# Altium PCB PCBKraken.PcbDoc
Units mm, origin at the board's own origin, x right, y up, seen from the top; angles counter-clockwise.
Board outline 105 x 75 mm, 2 copper layers (Top Layer, Bottom Layer); 11 components, 19 nets, 61 pads, 0 vias.
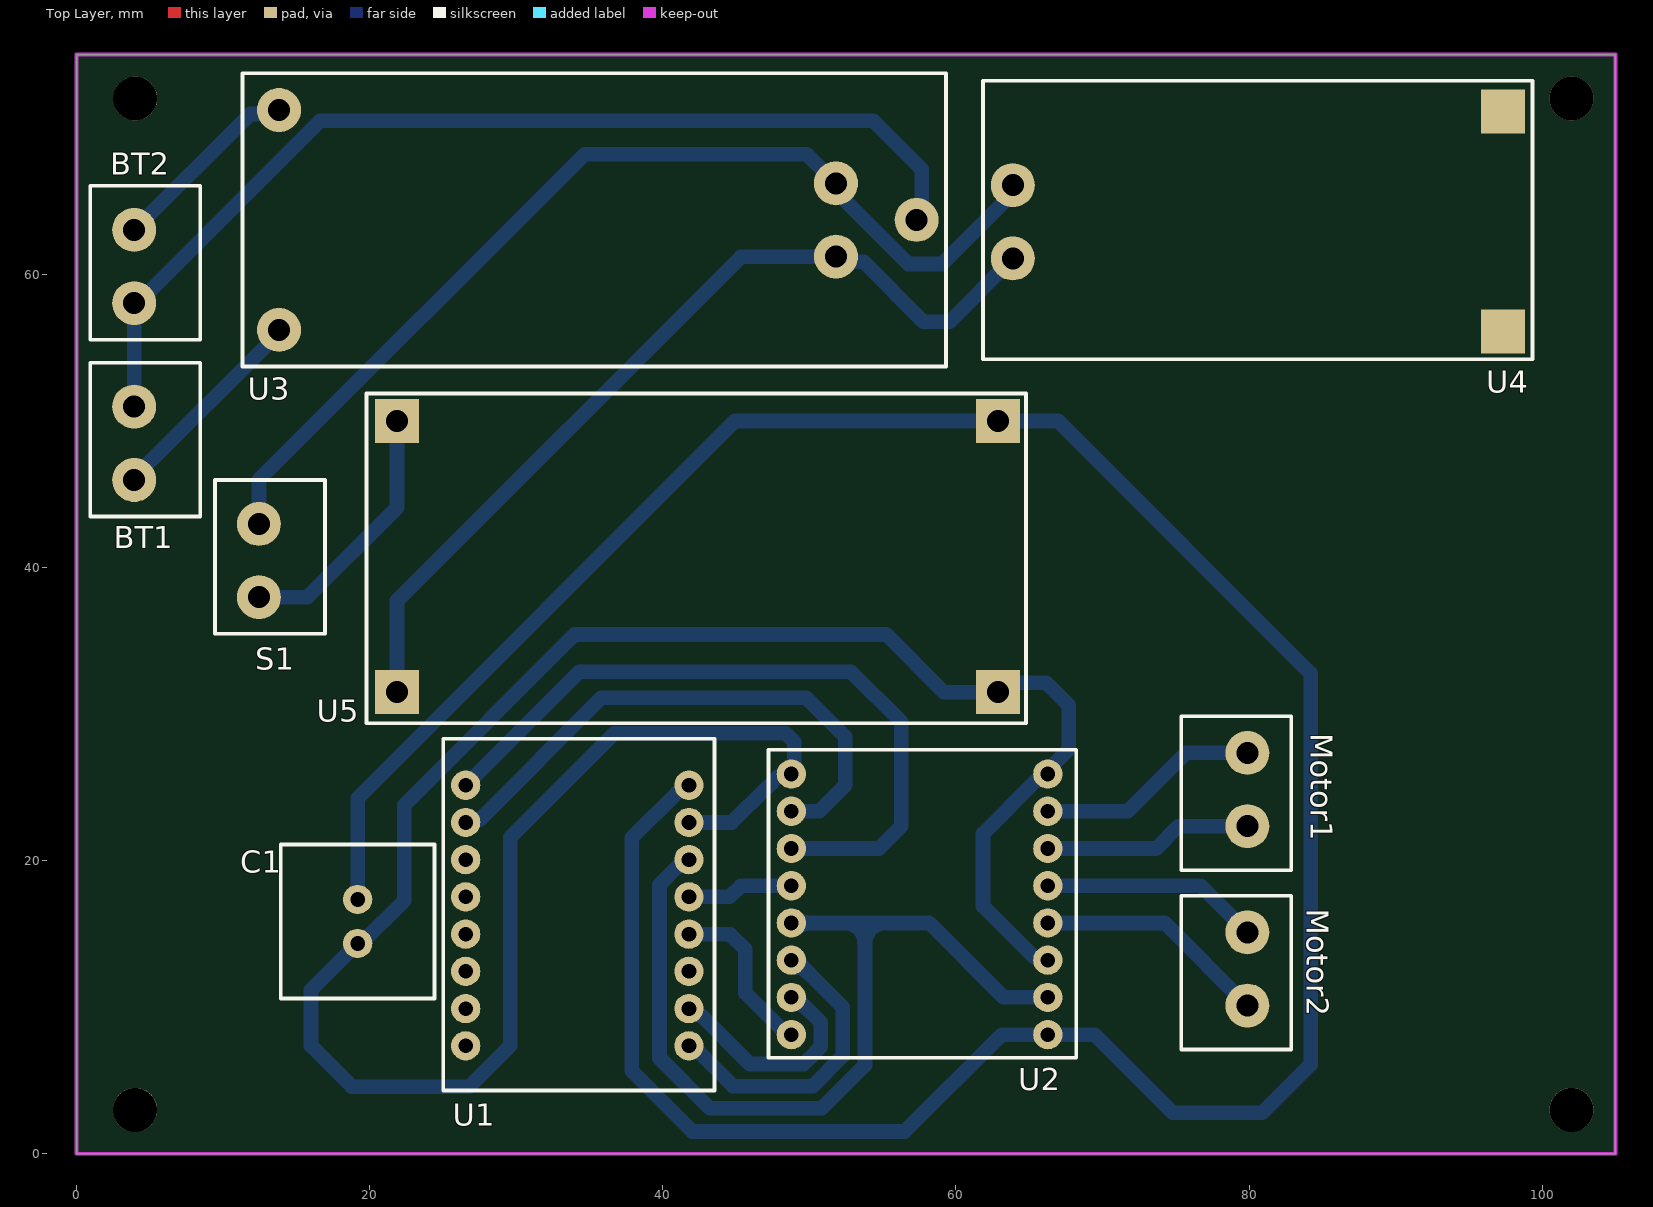
[diagram p0: Top Layer view]
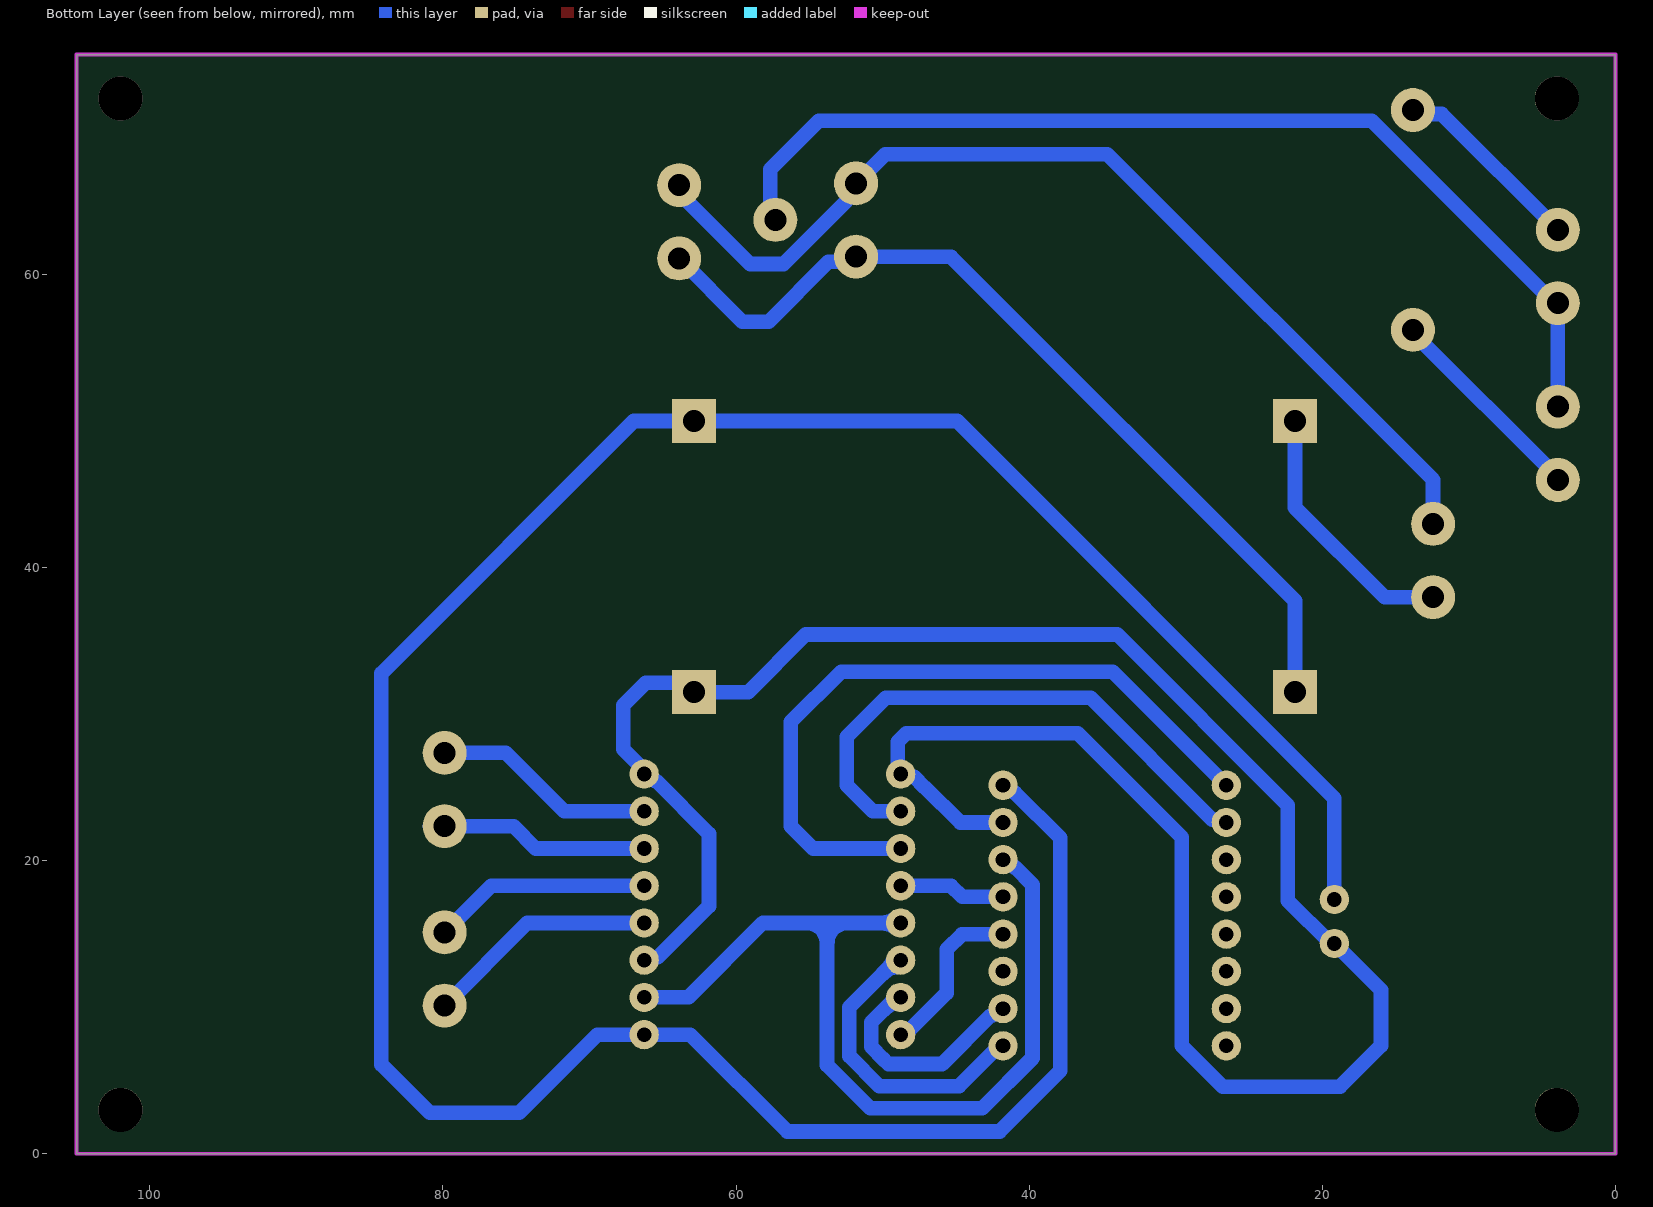
[diagram p1: Bottom Layer view, seen from below]
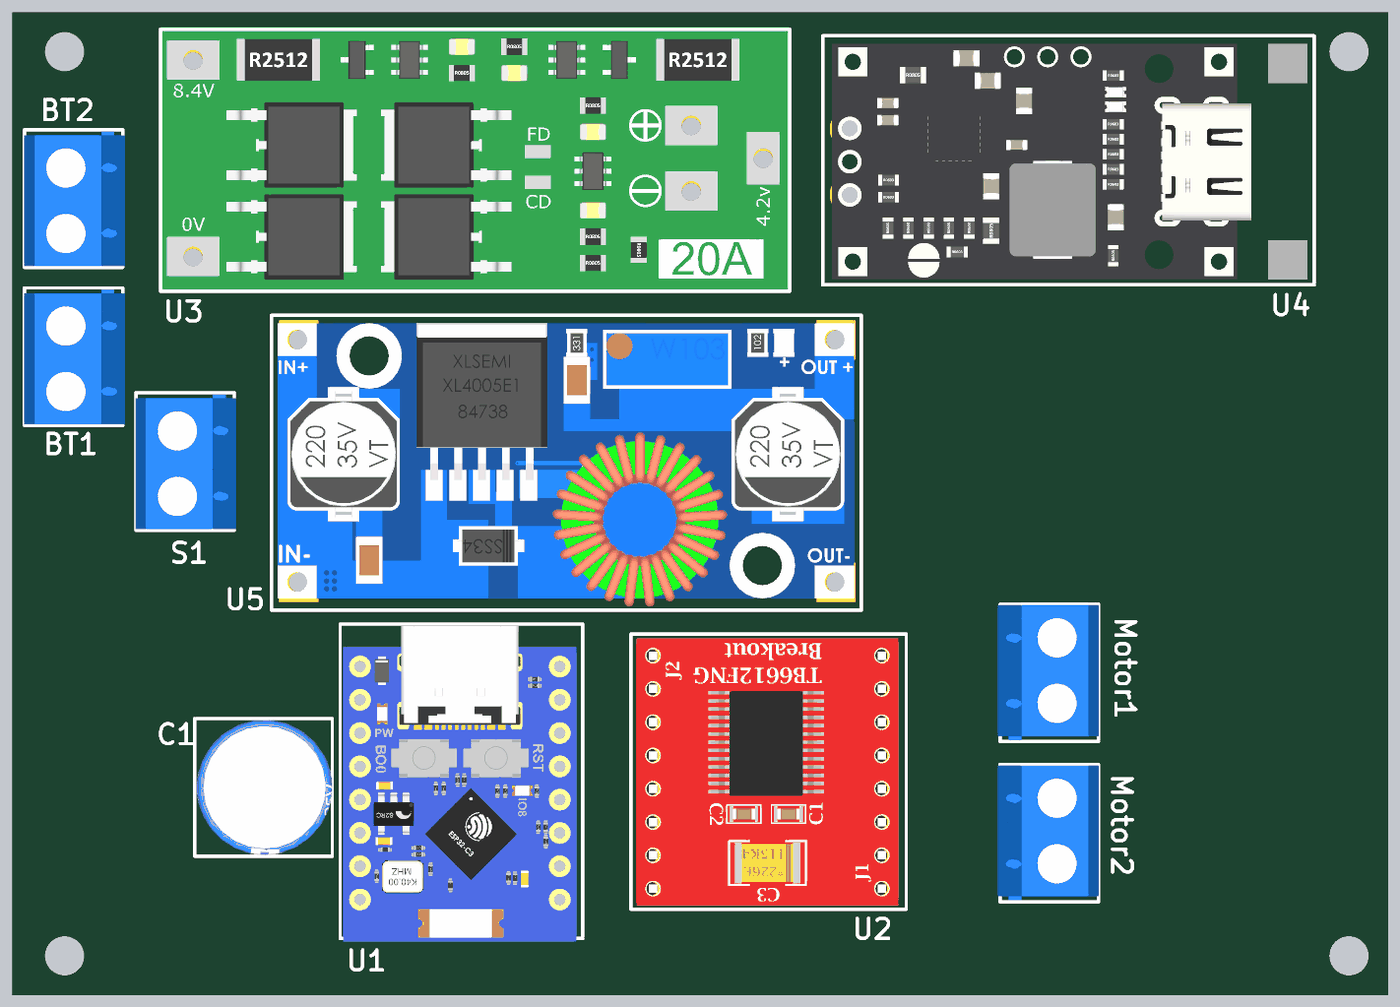
[diagram p2: 3D render of the assembled board from above, using the file's embedded part models]

## Layer stack, top to bottom
Top Solder: solder mask 0.0102, Solder Resist, Dk 3.5
Top Layer: signal copper 0.0356
Dielectric 1: dielectric 0.32, FR-4, Dk 4.8
Bottom Layer: signal copper 0.0356
Bottom Solder: solder mask 0.0102, Solder Resist, Dk 3.5

## Board outline
0,0 0,75 105,75 105,0

## Design rules (kind name [scope] priority, off if disabled: settings)
BoardOutlineClearance [All] p1: gap=0.508 ignorepadtopadclearanceinfootprint=FALSE
Clearance [All] p1: gap=0.508 ignorepadtopadclearanceinfootprint=FALSE
HoleSize [All] p1: absolutevalues=TRUE maxlimit=3 minlimit=0.4 maxpercent=80.000 minpercent=20.000
MinimumAnnularRing [All] p1: minimumring=0.254
PolygonConnect [All] p1: connectstyle=Relief reliefconductorwidth=0.254 reliefentries=4 polygonreliefangle="90 Angle" airgapwidth=0.254
RoutingVias [All] p1: holewidth=0.8 width=2 viastyle="Through Hole" minholewidth=0.4 minwidth=1.524 maxholewidth=0.6 maxwidth=1.6
SolderMaskExpansion [All] p1: expansion=0 istentingtop=FALSE
Width POWER_WIDTH [InNet('NetBT1_1') Or InNet('NetBT1_2') Or InNet('NetBT2_1') Or InNet('NetS1_1') Or InNet('NetS1_2') Or InNet('NetU3_4') Or InNet('NetC1_1') Or InNet('NetC1_2') Or InNet('NetMotor1_1') Or InNet('NetMotor1_2') Or InNet('NetMotor2_1') Or InNet('NetMotor2_2')] p1: maxlimit=1.5 minlimit=1 preferedwidth=1 minimp=50.000000 maximp=50.000000 favimp=50.000000
Width [All] p2: maxlimit=1 minlimit=0.508 preferedwidth=0.508 minimp=50.000000 maximp=50.000000 favimp=50.000000
29 further rules are at their usual default settings.

## Classes and differential pairs
component class Power: BT1 BT2 S1 U3 U4 U5
component class "Motor driver": C1 Motor1 Motor2 U2
component class "MCU BLE": U1

## Components (designator, comment, footprint, x,y, rotation, side; value= is the part's Value field where it differs from the comment)
BT1 "Header 2" BORNERAS 0.937,53.974 r270 top
BT2 "Header 2" BORNERAS 0.937,66.039 r270 top
C1 "Cap Pol1" CAPACITOR1000UF 13.927,21.101 r270 top value=100pF
Motor1 "Header 2" BORNERAS 82.883,19.352 r90 top
Motor2 "Header 2" BORNERAS 82.883,7.113 r90 top
S1 "SW-SPST" BORNERAS 9.446,45.973 r270 top
U1 "ESP32-C3 SUPERMINI" ESP32C3SUPERMINI 25.283,28.321 r270 top
U2 "TB6612FNG devkit v1.0" TB6612FNG 67.538,6.731 r90 top
U3 "BMS 2S 20A" BMS_2S_20A_HW391 11.316,53.714 r0 top
U4 "CARGADOR 2S USB-C" CARGADOR_2S_USBC 61.881,54.587 r0 top
U5 "v1" XL4005_MODULE 64.365,51.496 r180 top

## Footprints (in the part's own frame and the unit in brackets; to place one, negate y for a bottom-side part, rotate by r counter-clockwise, add the part's x,y. Pads: shape width x height; smd on the part's side, far side on the other; paste and mask are expansions set on the pad)
BMS_2S_20A_HW391 [mm]
  round 3 hole 1.5: 1(2.5,2.5) 2(46,10) 3(2.5,17.5) 4(40.5,7.5) 5(40.5,12.5)
  silkscreen extent 0.01,0 48.01,20, body extent 0,0.16 48,20.16, height 2.3
BORNERAS [mm]
  round 3 hole 1.5: 1(3,3) 2(8,3)
  silkscreen extent 0,0 10.5,7.5, body extent 0.11,-0.04 10.41,7.66, height 10
CAPACITOR1000UF [mm]
  round 2 hole 1: 1(3.75,5.25) 2(6.75,5.25)
  silkscreen extent 0,0 10.5,10.5, body extent 0.09,0.16 10.41,10.5, height 17.01
CARGADOR_2S_USBC [mm]
  rect 3x3 smd: 1(35.433,1.524) 2(35.433,16.51)
  round 3 hole 1.5: 3(2,11.5) 4(2,6.5)
  silkscreen extent -0.04,-0.38 37.46,18.62, body extent 0.68,0.02 32.68,18.02, height 3.31
ESP32C3SUPERMINI [mm]
  round 2 hole 1: 1(3.175,16.5) 2(5.715,16.5) 3(8.255,16.5) 4(10.795,16.5) 5(13.335,16.5) 6(15.875,16.5) 7(18.415,16.5) 8(20.955,16.5) 9(20.955,1.27) 10(18.415,1.27) 11(15.875,1.27) 12(13.335,1.27) 13(10.795,1.27) 14(8.255,1.27) 15(5.715,1.27) 16(3.175,1.27)
  silkscreen extent 0,-0.25 24,18.25, body extent 0.14,-0.02 24.24,17.78, height 4.41
TB6612FNG [mm]
  round 2 hole 1: 1(1.397,1.27) 2(3.937,1.27) 3(6.477,1.27) 4(9.017,1.27) 5(11.557,1.27) 6(14.097,1.27) 7(16.637,1.27) 8(19.177,1.27) 9(19.177,18.77) 10(16.637,18.77) 11(14.097,18.77) 12(11.557,18.77) 13(9.017,18.77) 14(6.477,18.77) 15(3.937,18.77) 16(1.397,18.77)
  silkscreen extent -0.17,-0.68 20.83,20.32, body extent 0.09,-0.09 20.49,19.91, height 2
XL4005_MODULE [mm]
  rect 3x3 hole 1.5: 1(42.5,1.5) 2(1.5,1.5) 3(42.5,20) 4(1.5,20)
  silkscreen extent -0.42,-0.38 44.58,22.12, body extent 0.13,0.2 44.13,21.84, height 12.35

## Part data
BT1 BT2 Motor1 Motor2: "Header, 2-Pin", LatestRevisionDate=17-Jul-2002, LatestRevisionNote="Re-released for DXP Platform.", Publisher="Altium Limited"
C1: "Polarized Capacitor (Radial)", LatestRevisionDate=17-Jul-2002, LatestRevisionNote="Re-released for DXP Platform.", PackageDescription="Polarized Capacitor (Radial); 2 Leads", PackageReference=RB7.6-15, Published=8-Jun-2000, Publisher="Altium Limited"
S1: "Single-Pole, Single-Throw Switch", LatestRevisionDate=17-Jul-2002, LatestRevisionNote="Re-released for DXP Platform.", PackageDescription="Switch; 2 Leads", PackageReference=SPST-2, Published=24-Mar-1999, Publisher="Altium Limited"
U1: "ESP32-C3 SUPERMINI V1.0"
U2: Manufacturer=Toshiba
U3: "BMS 2S 20A  v1.0"
U4: "CARGADOR 2S USB-C v1.0"
U5: library part XL4005_MODULE, "XL4005_MODULE"

## Free pads (board coordinates)
  round 3 hole 3 unplated: 3(4,3) 3(4,72) 3(102,3) 3(102,72)

## Nets (pads, with @x,y where several pads share a name; then routed paths per layer and width w, separated by ;. In a path a pad name is that pad's centre, name@x,y a point inside that pad or via, vN(x,y) a via of type N, cw(c..) or ccw(c..) an arc to the next point about the centre after c; other vN are vias at no path point)
NetBT1_1: BT1.1 BT2.2 U3.2 | length 70.9
  Bottom Layer w1: BT1.1 BT2.2 4.191,58.039 16.63,70.478 27.679,70.478 27.686,70.485 54.356,70.485 57.658,67.183 57.658,64.056 U3.2
NetBT1_2: BT1.2 U3.1 | length 14.3
  Bottom Layer w1: BT1.2 3.937,46.155 13.816,56.033 U3.1
NetBT2_1: BT2.1 U3.3 | length 13.3
  Bottom Layer w1: BT2.1@3.95,63.039 11.849,70.938 13.54,70.938 U3.3
NetC1_1: C1.1 U1.1 U2.1 U5.2 | length 192
  Bottom Layer w1: C1.1 19.177,24.257 44.916,49.996 U5.2 66.971,49.996 84.201,32.766 84.201,6.096 80.899,2.794 74.803,2.794 69.469,8.128 U2.1 63.119,8.128 56.515,1.524 42.018,1.524 37.886,5.656 37.886,21.549 40.951,24.614 40.98,24.614 41.512,25.146 U1.1
NetC1_2: C1.2 U1.2 U2.3 U2.8 U2.9 U5.4 | length 157.5
  Bottom Layer w1: C1.2@19.175,14.349 16.002,11.176 16.002,7.366 18.796,4.572 26.797,4.572 29.591,7.366 29.591,21.59 36.703,28.702 48.374,28.702 48.959,28.116 48.959,26.099 48.577,25.717 47.844,25.717 47.146,25.019 47.117,25.019 44.704,22.606 U1.2 ; C1.2 19.431,14.351 22.352,17.272 22.352,23.785 34,35.433 55.245,35.433 59.182,31.496 U5.4 63.5,32.131 66.167,32.131 67.691,30.607 67.691,27.602 66.268,26.179 U2.8 66.04,25.908 65.997,25.908 65.497,25.408 65.413,25.408 61.849,21.844 61.849,16.891 65.341,13.399 66.077,13.399 U2.3
NetMotor1_1: Motor1.1 U2.6 | length 15.1
  Bottom Layer w1: U2.6 73.66,20.828 75.184,22.352 Motor1.1 ; Motor1.1@80.075,22.352 Motor1.1@80.899,22.352
NetMotor1_2: Motor1.2 U2.7 | length 15.3
  Bottom Layer w1: U2.7 71.727,23.368 75.711,27.352 Motor1.2
NetMotor2_1: Motor2.1 U2.4 | length 15.9
  Bottom Layer w1: U2.4 74.248,15.748 Motor2.1
NetMotor2_2: Motor2.2 U2.5 | length 14.9
  Bottom Layer w1: U2.5 76.708,18.288 Motor2.2
NetS1_1: S1.1 U3.5 U4.3 | length 69.6
  Bottom Layer w1: S1.1 12.446,45.974 34.671,68.199 49.831,68.199 52.199,65.831 52.199,65.29 52.66,64.829 52.66,64.815 56.769,60.706 59.041,60.706 63.881,65.546 U4.3
NetS1_2: S1.2 U5.1 | length 17.9
  Bottom Layer w1: S1.2 15.748,37.973 21.865,44.09 U5.1
NetU1_3: U1.3 U2.2 U2.13 | length 60.5
  Bottom Layer w1: U1.3 41.512,20.066 40.98,19.534 40.951,19.534 39.775,18.358 39.775,6.534 43.205,3.104 50.849,3.104 53.792,6.047 53.792,15.748 ; U2.13 53.792,15.748 ; U2.2 63.246,10.668 58.166,15.748 53.792,15.748
NetU1_4: U1.4 U2.12 | length 7.3
  Bottom Layer w1: U1.4 44.577,17.526 45.339,18.288 U2.12
NetU1_5: U1.5 U2.16 | length 11.6
  Bottom Layer w1: U1.5 41.789,14.98 44.583,14.98 45.625,13.938 45.625,10.972 48.277,8.319 48.577,8.319 U2.16
NetU1_7: U1.7 U2.15 | length 15.4
  Bottom Layer w1: U1.7 42.054,9.906 42.554,9.406 42.664,9.406 45.95,6.12 49.6,6.12 49.943,6.463 50.776,7.296 50.776,8.96 49.943,9.793 49.6,10.136 49.571,10.136 49.039,10.668 U2.15
NetU1_8: U1.8 U2.14 | length 20.7
  Bottom Layer w1: U1.8 42.037,7.366 44.791,4.612 50.224,4.612 52.284,6.672 52.284,9.992 49.6,12.676 49.571,12.676 49.039,13.208 U2.14
NetU1_15: U1.15 U2.10 | length 38.2
  Bottom Layer w1: U1.15 26.744,22.797 27.496,22.797 35.814,31.115 49.784,31.115 52.451,28.448 52.451,25.146 50.673,23.368 U2.10
NetU1_16: U1.16 U2.11 | length 49.6
  Bottom Layer w1: U1.16 34.3,32.893 52.832,32.893 56.261,29.464 56.261,22.352 54.737,20.828 U2.11
NetU3_4: U3.4 U4.4 U5.3 | length 61.6
  Bottom Layer w1: U5.3 21.865,37.74 45.339,61.214 U3.4 52.175,60.855 53.699,60.855 57.785,56.769 59.563,56.769 U4.4
pads on no net: U1.6 U1.9 U1.10 U1.11 U1.12 U1.13 U1.14 U4.1 U4.2

## Keep-outs
Keep-Out Layer:
  the board outline again, w0.254

## Other copper
Bottom Layer:

## Silkscreen, mask and mechanical layers (free items; w line width, h text height)
Mechanical 1:
  the board outline again, w0.254